# Altium PCB Power_supply.PcbDoc
Units mm, origin at the board's own origin, x right, y up, seen from the top; angles counter-clockwise.
Board outline 53.02 x 38.23 mm, 2 copper layers (Top Layer, Bottom Layer), stack 0.871 mm thick; 14 components, 11 nets, 39 pads, 3 vias.
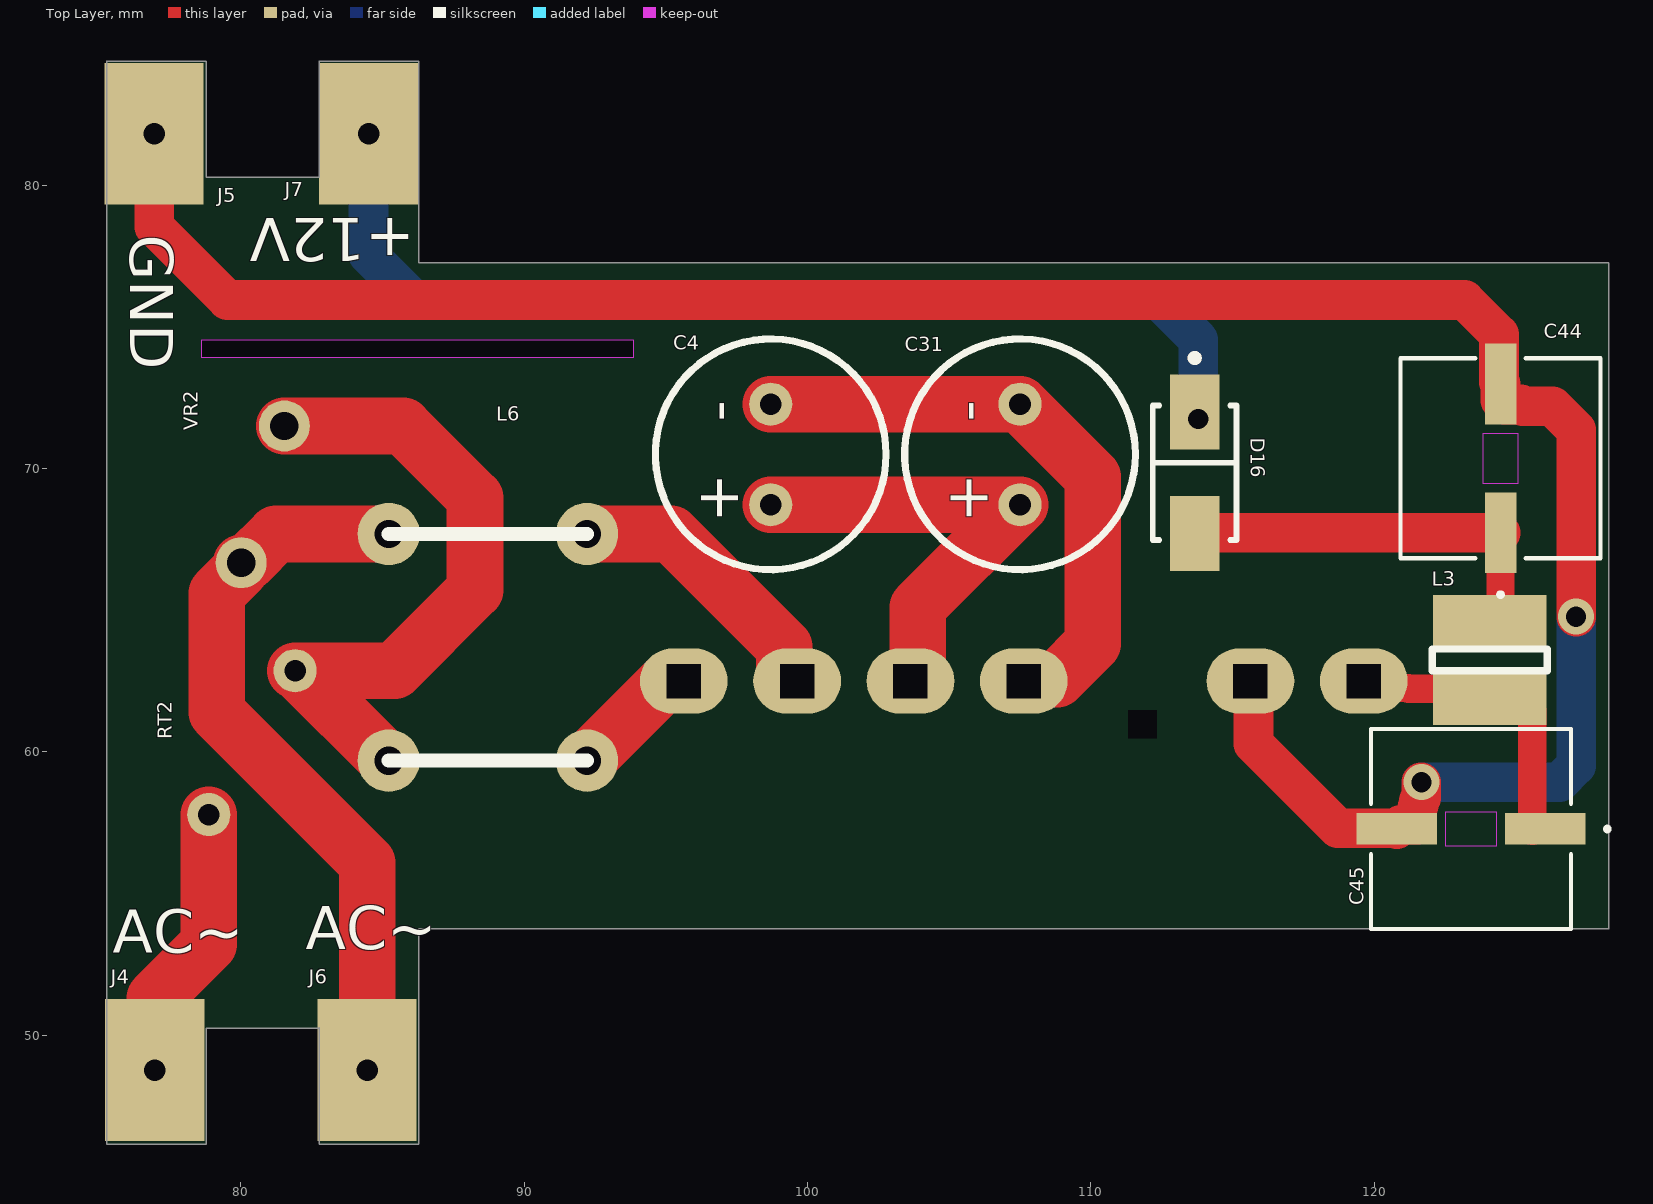
[diagram p0: Top Layer view]
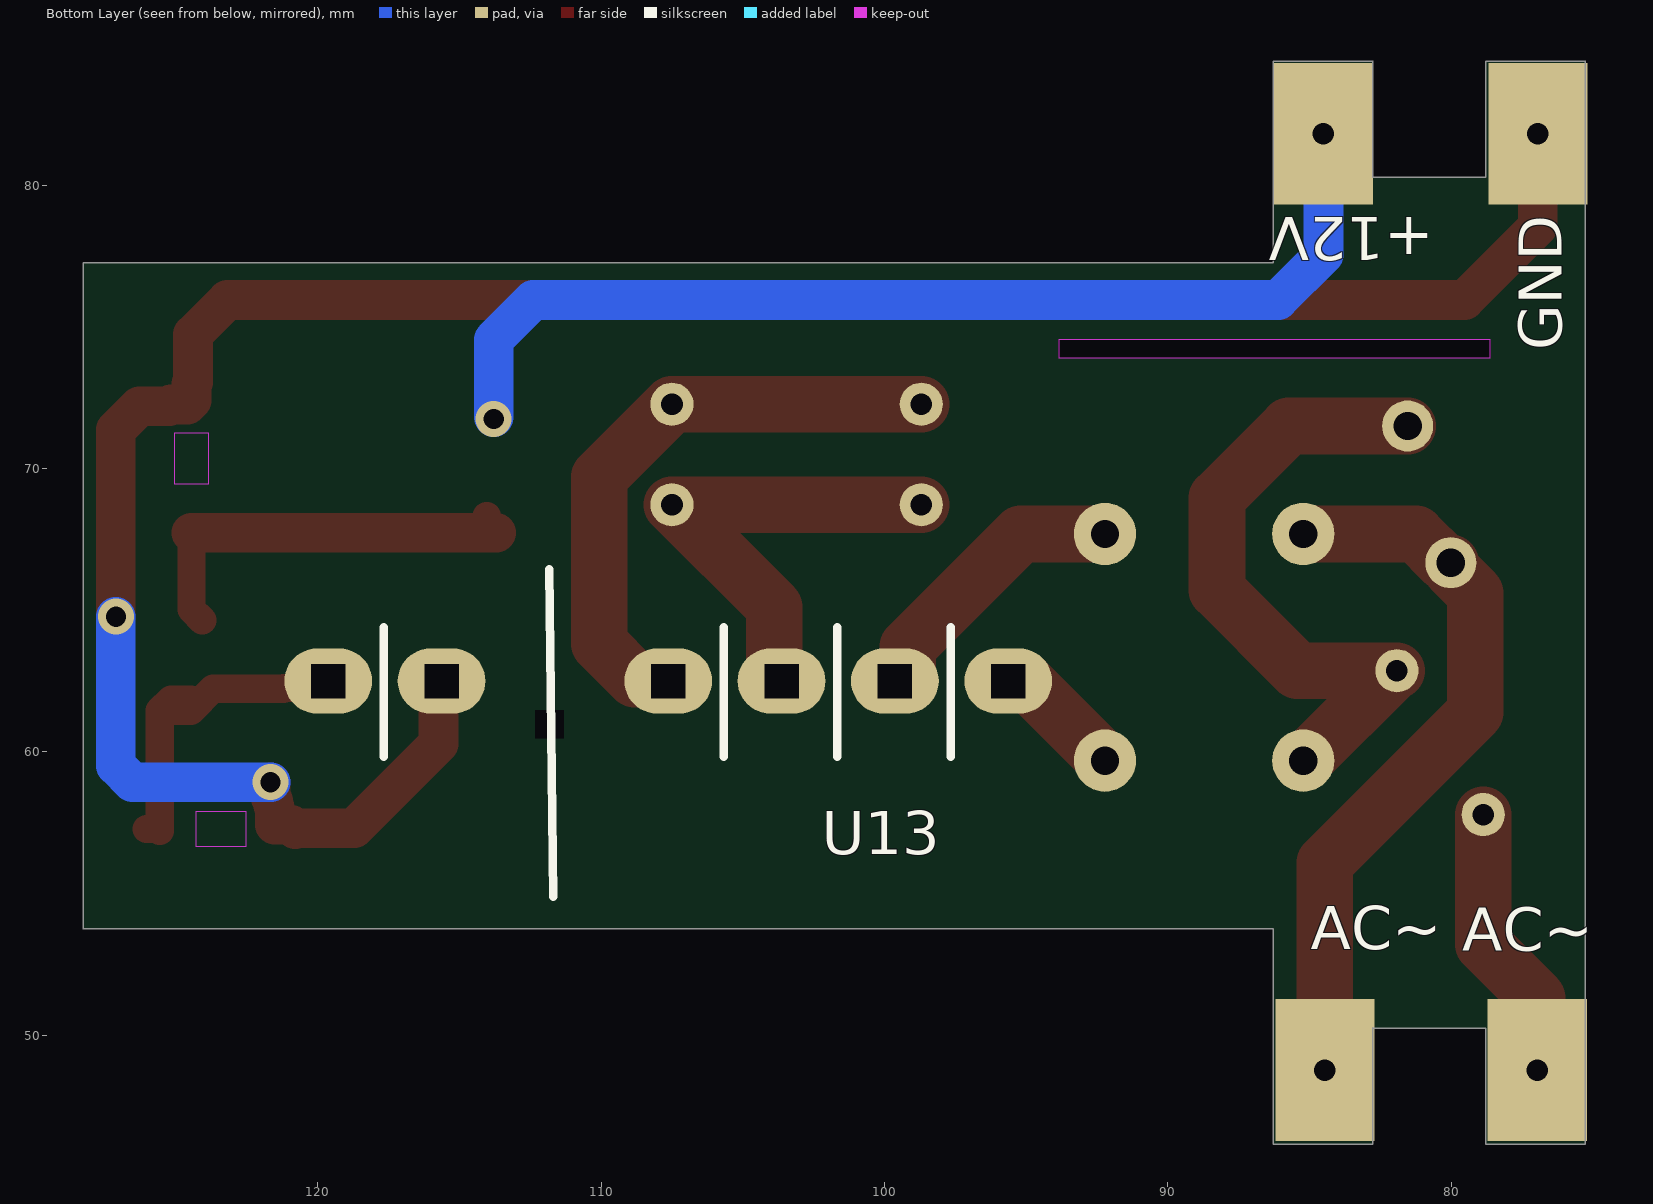
[diagram p1: Bottom Layer view, seen from below]
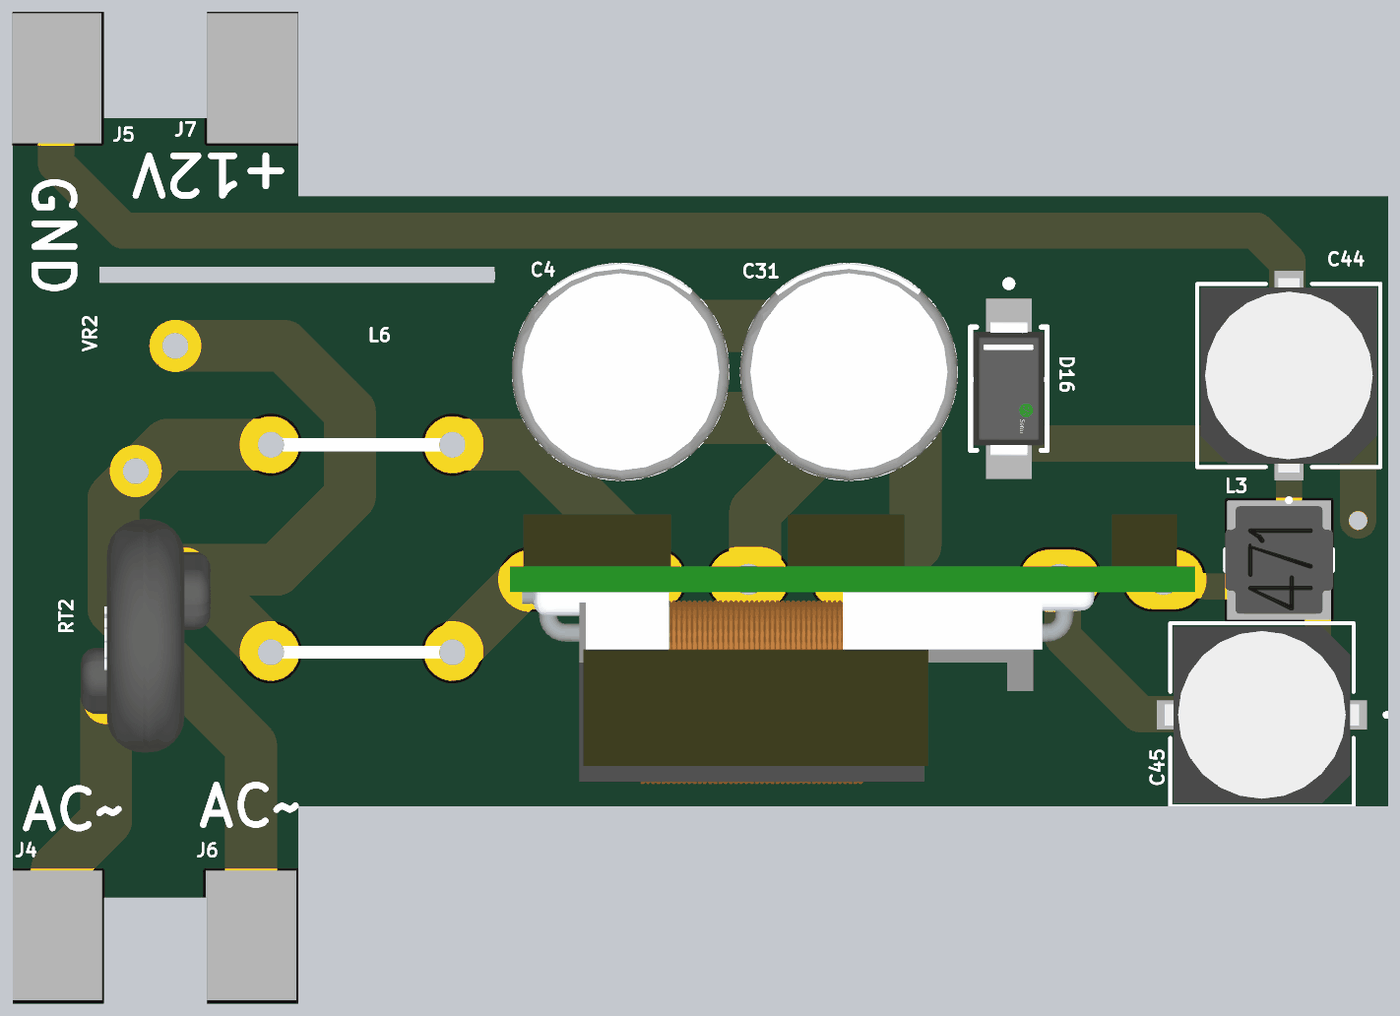
[diagram p2: 3D render of the assembled board from above, using the file's embedded part models]

## Layer stack, top to bottom
Top Solder: solder mask 0.0102, Solder Resist, Dk 3.5
Top Layer: signal copper 0.0356
Dielectric 1: dielectric 0.8, FR-4, Dk 4.8
Bottom Layer: signal copper 0.0356
Bottom Solder: solder mask 0.0102, Solder Resist, Dk 3.5

## Board outline
75.272,46.149 78.772,46.149 78.778,46.155 78.778,50.249 82.758,50.249 82.758,46.167 82.772,46.149 86.272,46.149 86.278,46.155 86.278,53.749 128.272,53.749 128.278,53.755 128.278,77.255 128.272,77.262 86.278,77.262 86.278,84.355 86.265,84.374 82.765,84.374 82.758,84.367 82.758,80.274 78.778,80.274 78.778,84.355 78.765,84.374 75.265,84.374 75.258,84.367
cut-out: 78.613,73.914 78.613,74.549 93.853,74.549 93.853,73.914

## Design rules (kind name [scope] priority, off if disabled: settings)
Clearance [All] p1: gap=0.254 ignorepadtopadclearanceinfootprint=FALSE
PolygonConnect [All] p1: connectstyle=Relief reliefconductorwidth=0.254 reliefentries=4 polygonreliefangle="90 Angle" airgapwidth=0.254
RoutingVias [All] p1: holewidth=0.711 width=1.27 viastyle="Through Hole" minholewidth=0.711 minwidth=1.27 maxholewidth=0.711 maxwidth=1.27
SolderMaskExpansion [All] p1: expansion=0.102 istentingtop=FALSE
Width [All] p1: maxlimit=3 minlimit=0.254 preferedwidth=1 minimp=50.000000 maximp=50.000000 favimp=50.000000
30 further rules are at their usual default settings.

## Components (designator, comment, footprint, x,y, rotation, side; value= is the part's Value field where it differs from the comment)
C4 "6.8uF 450V" CAPPOL_10x13 98.7,70.5 r90 top
C31 "6.8uF 450V" CAPPOL_10x13 107.5,70.5 r90 top locked
C44 "100uF 25V" CAP_A765EB_KEM-L 124.46,70.358 r90 top
C45 "330uF 25V" CAP_A765EB_KEM-L 123.419,57.277 r180 top
D16 "SS14" DO-214-AC 113.665,69.85 r90 top
J4 "Pad_CONN 3.5mm" Pad_conn_3.5x5mm 76.962,48.768 r90 top
J5 "Pad_CONN 3.5mm" Pad_conn_3.5x5mm 76.937,81.813 r90 top
J6 "Pad_CONN 3.5mm" Pad_conn_3.5x5mm 84.455,48.768 r90 top
J7 "Pad_CONN 3.5mm" Pad_conn_3.5x5mm 84.506,81.813 r90 top
L3 "2.2uH" Coil_4.5x4.5_mm 124.079,63.246 r90 top
L6 "10uH" "Common Mode Choke Inductor  30mH" 88.717,63.69 r270 top
RT2 "MF72 5D7" "MF72 XD-7" 80.391,60.325 r270 top
U13 "LS05-13B12R3" "YLPTEC LS05-13B12R3" 107.632,62.5 r0 bottom locked
VR2 "HEL 10D471K" HEL_7D561K 80.772,69.088 r90 top

## Footprints (in the part's own frame and the unit in brackets; to place one, negate y for a bottom-side part, rotate by r counter-clockwise, add the part's x,y. Pads: shape width x height; smd on the part's side, far side on the other; paste and mask are expansions set on the pad)
CAP_A765EB_KEM-L [mm]
  rect 2.843x1.113 smd paste+0 mask+0: 1(-2.625,0) 2(2.625,0)
  Keep-Out Layer region: -0.889,-0.607 -0.889,0.607 0.889,0.607 0.889,-0.607
  silkscreen extent -4.88,-3.53 3.53,3.53, body extent -3.75,-3.4 3.75,3.4, height 6.05
CAPPOL_10x13 [mil]
  round 60 hole 30: 1(-70,0) 2(69.68,0)
  silkscreen extent -160,-160 160,160, body extent -165,-165 165,165, height 598
Coil_4.5x4.5_mm [mm]
  rect 1.8x4 smd: 1(-1.397,0) 2(1.397,0)
  silkscreen extent -0.38,-2.03 0.38,2.03, body extent -2.07,-2.07 2.07,2.07, height 2.8
"Common Mode Choke Inductor  30mH" [mm] "Common Mode Choke Inductor  20mH For Filter Pitch 7*8mm"
  round 2.2 hole 1: 1(-4,-3.5) 2(-4,3.5) 3(4,-3.5) 4(4,3.5)
  silkscreen extent -4,-3.5 4,3.5, body extent -7.75,-5.5 7.75,5.5, height 17
DO-214-AC [mm]
  rect 2.65x1.75 smd paste+0 mask+0: 1(-2.15,0) 2(2.15,0)
  silkscreen extent -2.37,-1.48 4.17,1.48, body extent -3.57,-1.58 3.57,1.58, height 0.25
HEL_7D561K [mm] "HEL_7D561K"
  round 1.8 hole 1: 1(-2.413,0.762) 2(2.413,-0.762)
  body extent -4,-2.1 4,2.1, height 11
"MF72 XD-7" [mil]
  round 60 hole 30: 1(-100,60) 2(100,-60)
  body extent -177,-98 177,98, height 472
Pad_conn_3.5x5mm [mm] "Pad_conn_5x5mm"
  round 1.524 hole 0.762: 1(0,0)
  rect 5x3.5 smd: 1(0,0)
  rect 5x3.5 smd far side: 1(0,0)
"YLPTEC LS05-13B12R3" [mm] "YLPTEC LS05-13B12R322"
  oval 3.1x2.3 hole 1.2 square: 1(-12,0) 2(-8,0) 3(-4,0) 4(0,0) 5(8,0) 6(12,0)
  rect 0.5x0.7 hole 1 square: ""(4.191,1.524)
  silkscreen extent -9.97,-3.94 10.03,7.62, body extent -13.19,-2.5 13.21,7.9, height 2.5

## Part data
C4 C31: library part CAP-POLAR, "6.8uF 450V LOW ESR"
C44: library part CAP_POL_SMD, "100uF 25V SMD,D6.3xL5.4mm  RST100UF25V004​ /   KNSCHA"
C45: library part CAP_POL_SMD, "330uF 25V SMD,D6.3xL7.7mm  KNSCHA"
J4 J5 J6 J7: library part Klema_15_A
L3: library part Coil, "2.2uH 3A / 40mΩMAX  MPS MPL-AL4020-2R2"
L6: library part Drossel_Synphaze, "10uH  UU9.8 Common Mode Choke Inductor  /  / https://www.aliexpress.com/item/1005010443177841.html?spm=a2g0o.productlist.main.2.581f7bb894iQm9&algo_pvid=ef88ecc3-47f4-4459-8795-a7f2bc477caf&algo_exp_id=ef88ecc3-47f4-4459-8795-a7f2bc477caf-1&pdp_ext_f=%7B%22order%22%3A%22121%22%2C%22spu_best_type%22%3A%22price%22%2C%22eval%22%3A%221%22%2C%22fromPage%22%3A%22search%22%7D&pdp_npi=6%40dis%21UAH%21205.26%2196.09%21%21%2127.70%2112.97%21%402103973d17954349978863633e10a8%2112000052425269179%21sea%21UA%214339914066%21X%211%210%21n_tag%3A-29919%3Bd%3A9b83968a%3Bm03_new_user%3A-29895&curPageLogUid=TjiBi6yV6N5C&utparam-url=scene%3Asearch%7Cquery_from%3A%7Cx_object_id%3A1005010443177841%7C_p_origin_prod%3A"
RT2: library part RES-TEMP
VR2: library part MOV, "Metal Oxide Varistor  HEL 10D471K"

## Via types
v1: diameter 1.27, hole 0.711, Top Layer to Bottom Layer, tented both sides, 3 vias

## Nets (pads, with @x,y where several pads share a name; then routed paths per layer and width w, separated by ;. In a path a pad name is that pad's centre, name@x,y a point inside that pad or via, vN(x,y) a via of type N, cw(c..) or ccw(c..) an arc to the next point about the centre after c; other vN are vias at no path point)
NetC4_1: C4.1 C31.1 U13.3 | length 16.5
  Top Layer w2: C4.1 C31.1 103.886,65.108 U13.3@103.886,62.5
NetC4_2: C4.2 C31.2 U13.4 | length 21.3
  Top Layer w2: C4.2 C31.2 110.069,69.701 110.069,63.822 108.805,62.557 107.689,62.557 U13.4
NetC44_1: C44.1 D16.1 L3.2 | length 14.8
  Top Layer w1: D16.1 114.04,68.075 D16.1@114.04,68.326 ; L3.2 124.46,65.024 C44.1
  Top Layer w1.4: D16.1@113.698,67.733 C44.1
NetC44_2: C44.2 C45.2 J5.1 U13.5 | length 85.7
  Top Layer w1.4: J5.1@76.937,81.813 76.937,78.537 79.527,75.946 123.19,75.946 124.404,74.732 124.404,73.039 C44.2 124.46,72.405 124.604,72.261 125.182,72.261 125.242,72.201 126.293,72.201 127.127,71.367 v1(127.127,64.77) ; U13.5@115.632,61.925 115.739,61.818 115.739,60.283 118.72,57.302 C45.2@120.794,57.302 ; C45.2 120.937,57.421 121.515,57.421 121.515,58.037 121.576,58.097 121.576,58.279 121.666,58.37 v1(121.666,58.928)
  Bottom Layer w1.4: v1(121.666,58.928) 126.541,58.928 127.127,59.514 v1(127.127,64.77)
NetC45_1: C45.1 L3.1 U13.6 | length 12.4
  Top Layer w1: U13.6 119.881,62.251 121.2,62.251 121.221,62.23 123.698,62.23 124.479,61.449 125.179,61.449 L3.1@125.579,61.449 ; L3.1@124.479,61.849 125.179,61.849 L3.1@125.579,61.449 ; C45.1 125.65,57.277 125.579,57.206 L3.1@125.579,61.449
NetD16_2: D16.2 J7.1 | length 37.5
  Bottom Layer w1.4: J7.1@84.506,81.813 84.506,77.546 86.106,75.946 112.395,75.946 113.792,74.549 v1@113.792,71.819
  other v1: 113.792,71.746
NetJ4_1: J4.1 RT2.2 | length 9.8
  Top Layer w1: J4.1@76.962,48.768 76.962,51.308
  Top Layer w2: 76.962,51.308 78.867,53.213 RT2.2
NetJ6_1: J6.1 L6.1 VR2.1 | length 26.1
  Top Layer w2: J6.1@84.455,48.768 84.455,56.083 79.146,61.392 79.146,65.595 80.01,66.459 VR2.1 80.226,66.675 81.241,67.69 L6.1
NetL6_2: L6.2 U13.2 | length 10.1
  Top Layer w2: L6.2@92.271,67.69 95.19,67.69 99.175,63.705 99.175,62.639 99.313,62.5 U13.2
NetL6_3: L6.3 RT2.1 VR2.2 | length 23.2
  Top Layer w2: VR2.2 85.725,71.501 88.265,68.961 88.265,65.71 85.42,62.865 RT2.1 81.978,62.865 85.153,59.69 L6.3
NetL6_4: L6.4 U13.1 | length 4.5
  Top Layer w2: L6.4@92.255,59.728 94.97,62.443 95.575,62.443 U13.1
pads on no net: U13.

## Silkscreen, mask and mechanical layers (free items; w line width, h text height)
Top Overlay:
  text "+12V" at 86.131,78.842 h1.52 r180
  text "GND" at 76.098,78.257 h1.52 r270
  text "AC~" at 82.296,53.035 h1.52
  text "AC~" at 75.471,52.901 h1.52
Bottom Overlay:
  text "+12V" at 80.62,78.867 h1.52 r180
  text "GND" at 76.098,74.168 h1.52 r270
  text "AC~" at 84.949,53.024 h1.52
  text "AC~" at 79.604,52.984 h1.52
Mechanical 1:
  lines w0.013: 86.265,46.167 82.765,46.167 82.765,50.267 78.765,50.267 78.765,46.167 75.265,46.167 75.265,84.367 78.765,84.367 78.765,80.267 82.765,80.267 82.765,84.367 86.265,84.367 ; 75.272,46.155 78.772,46.155 78.772,50.255 82.772,50.255 82.772,46.155 86.272,46.155 86.272,53.755 128.272,53.755 128.272,77.255 86.272,77.255 86.272,84.355 82.772,84.355 82.772,80.255 78.772,80.255 78.772,84.355 75.272,84.355 75.272,46.155
  lines w0.254: 78.613,73.914 93.853,73.914 93.853,74.549 78.613,74.549 78.613,73.914

## Text inside footprints (layer, text, board x,y; h text height)
C4: Top Overlay "-" at 97.557,71.643 h1.52 r90; Top Overlay "+" at 97.557,68.087 h1.52 r90
C31: Top Overlay "-" at 106.357,71.643 h1.52 r90; Top Overlay "+" at 106.357,68.087 h1.52 r90